# Altium PCB NB3000XN.PcbDoc (part 63 of 71)
Units mil, origin at the board's own origin, x right, y up, seen from the top; angles counter-clockwise.
Board outline 9527.56 x 6929.77 mil, 6 copper layers (Top Layer, GND+SHIELD, MidLayer1, MidLayer2, P2 - 3V3+5V0, Bottom Layer), stack 62.375 mil thick; 832 components, 1027 nets, 4655 pads, 4981 vias.
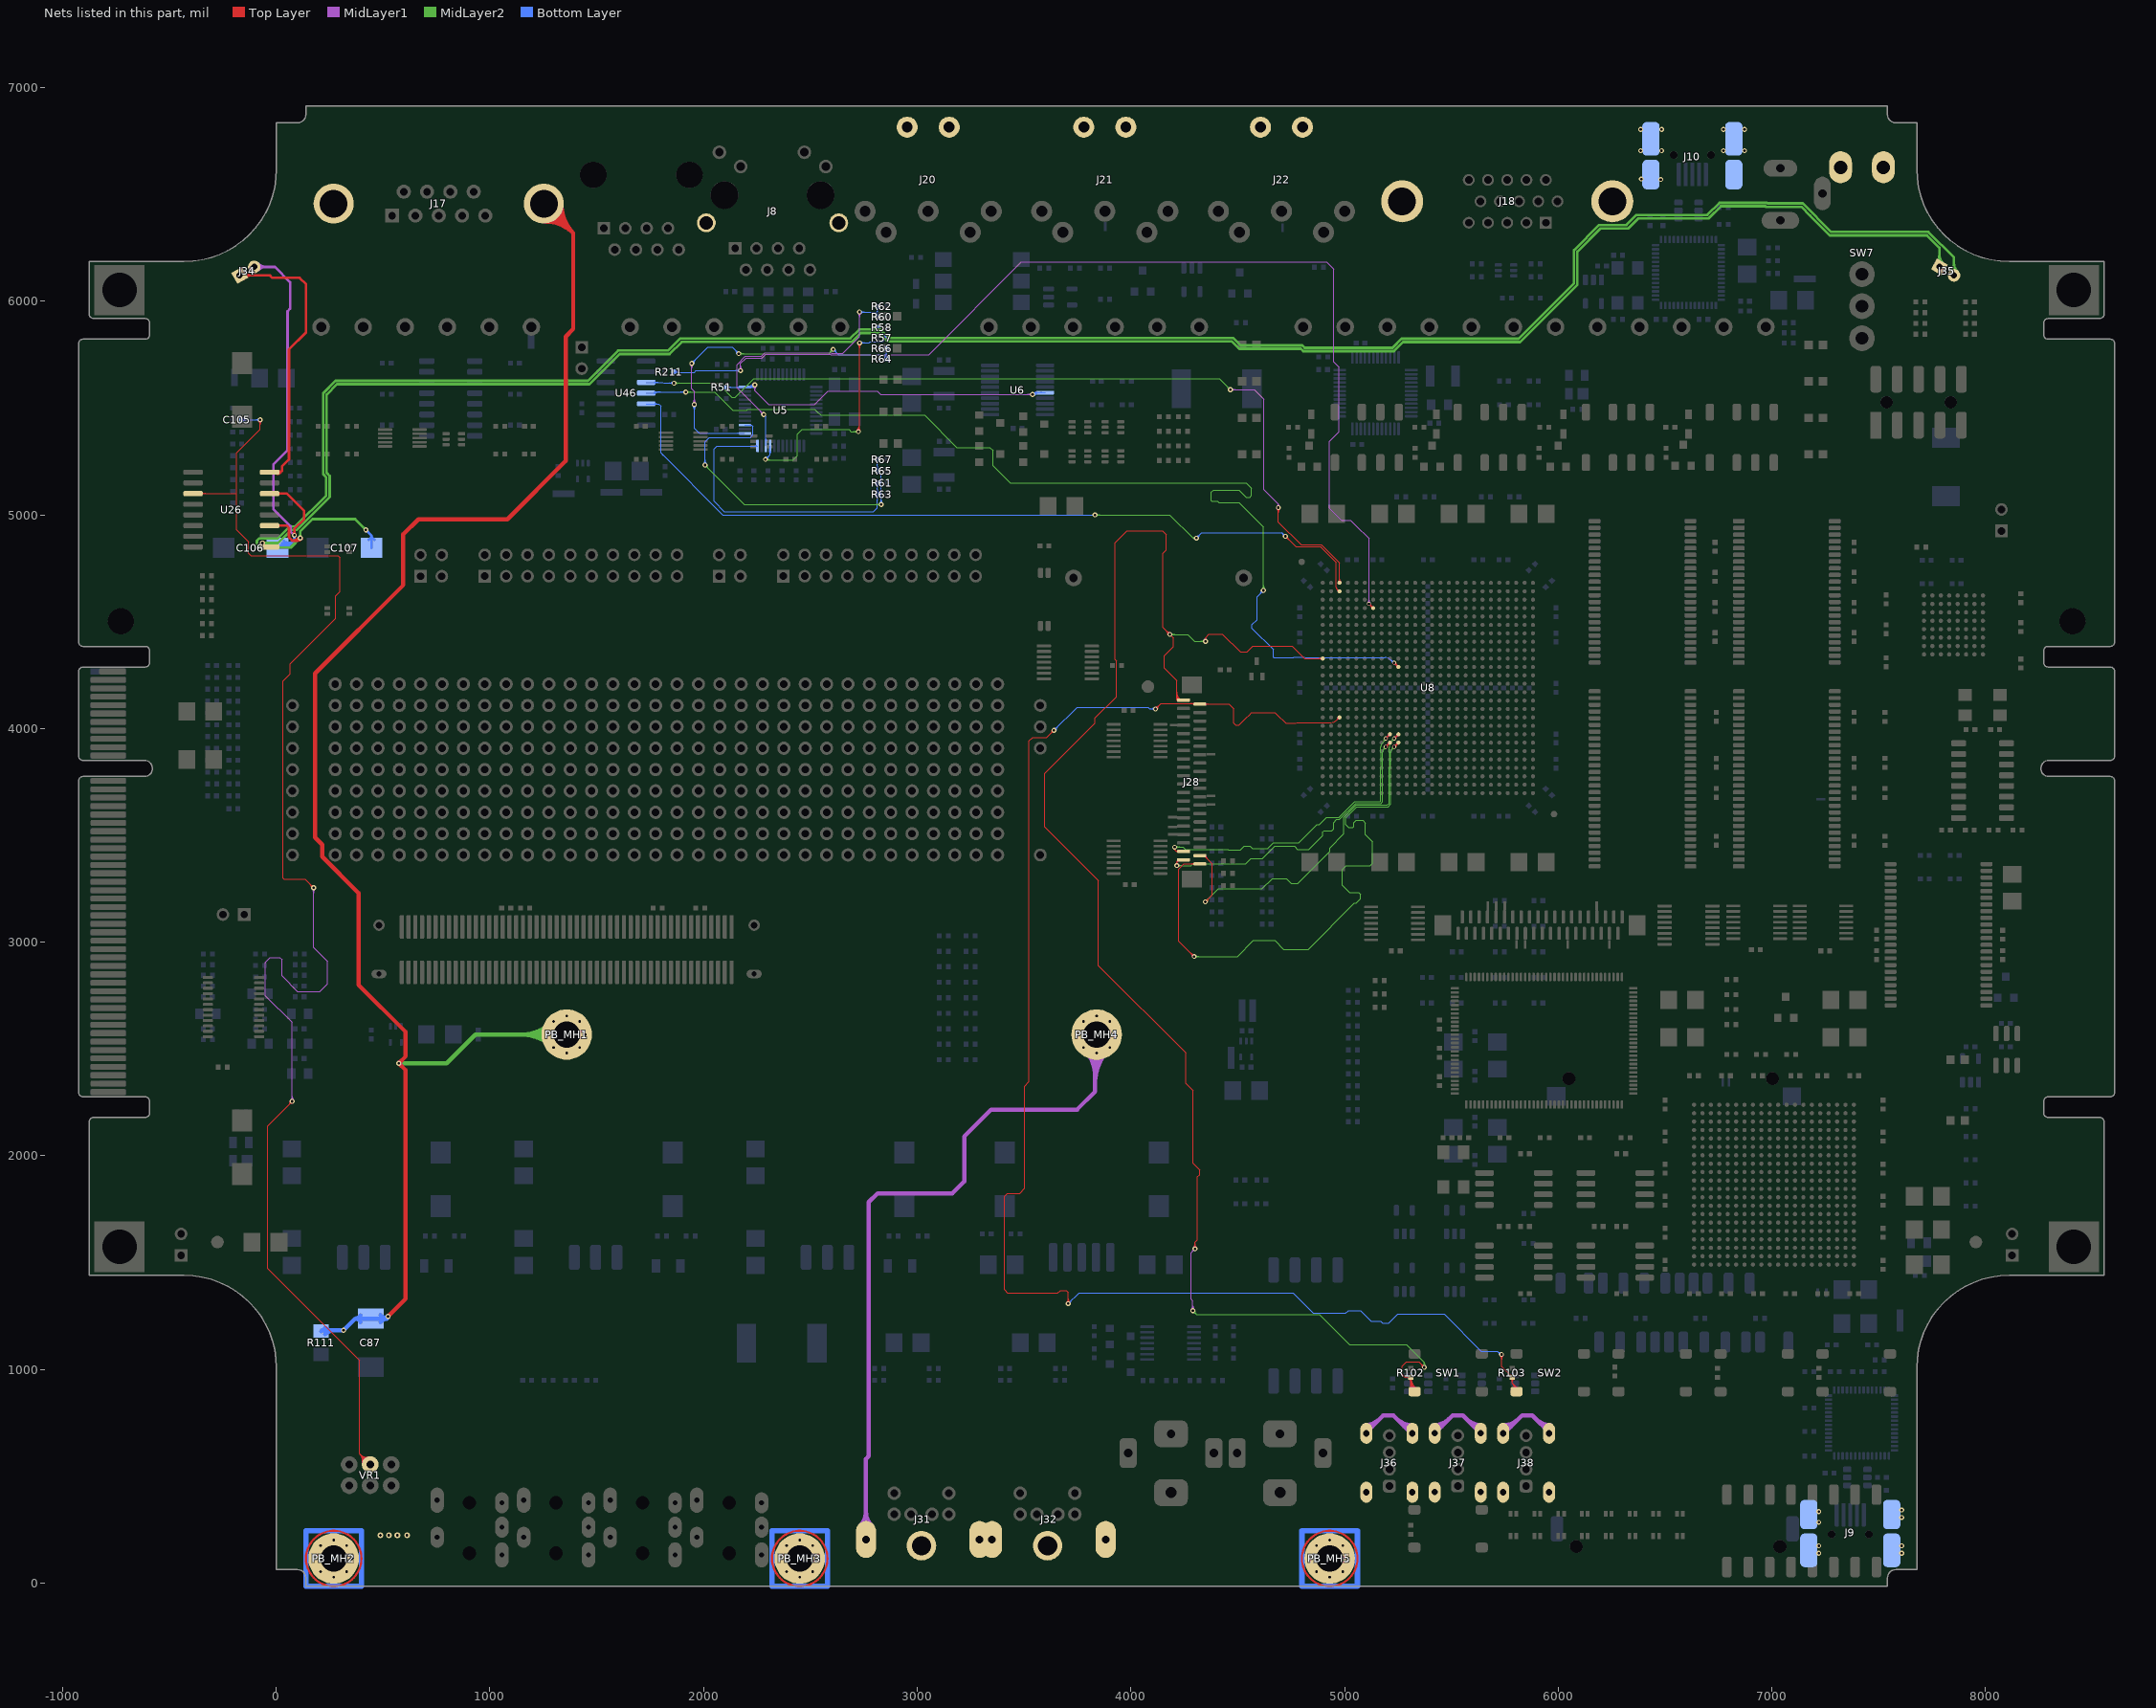
[diagram p67: the nets of this part, all layers, seen from the top]

## Via types
v1: diameter 23, hole 11.81, Top Layer to Bottom Layer, 3672 vias
v2: diameter 26, hole 11.81, Top Layer to Bottom Layer, 461 vias
v3: diameter 19, hole 11.81, Top Layer to Bottom Layer, tented both sides, 396 vias
v4: diameter 23.62, hole 11.81, Top Layer to Bottom Layer, 288 vias
v5: diameter 20, hole 11.81, Top Layer to Bottom Layer, 91 vias
v6: diameter 23, hole 11.81, Top Layer to Bottom Layer, tented both sides, 50 vias
v7: diameter 31, hole 11.81, Top Layer to Bottom Layer, 15 vias
v8: diameter 27.56, hole 11.81, Top Layer to Bottom Layer, tented both sides, 4 vias
v9: diameter 29, hole 11.81, Top Layer to Bottom Layer, 3 vias
v10: diameter 21, hole 11.81, Top Layer to Bottom Layer, 1 vias

## Nets (pads, with @x,y where several pads share a name; then routed paths per layer and width w, separated by ;. In a path a pad name is that pad's centre, name@x,y a point inside that pad or via, vN(x,y) a via of type N, cw(c..) or ccw(c..) an arc to the next point about the centre after c; other vN are vias at no path point) (continued)
RS485.RX_EN: U8.A3 U46.3 | length 4535.4
  Top Layer w4: v1@4683.47,5027.66 cw(c4667.26,5011.44) 4690.19,5011.44 cw(c4713.13,5011.44) v1@4696.91,5027.66 ; v1@4686.3,5030.49 cw(c4676.91,5021.1) 4690.19,5021.1 cw(c4703.47,5021.1) v1@4694.08,5030.49 ; v1(4690.19,5034.37) 4690.19,4966.71 4797.19,4859.71 4891.61,4859.71 4976.61,4774.7 4976.61,4724.74 4976.61,4720 4976.61,4710 U8.A3@4976.61,4682.13 ; U8.A3@4971.31,4687.43 ccw(c4958.51,4700.23) 4976.61,4700.23 ccw(c4994.72,4700.23) U8.A3@4981.92,4687.43 ; U8.A3@4971.42,4687.32 ccw(c4958.89,4699.85) 4976.61,4699.85 ccw(c4994.34,4699.85) U8.A3@4981.81,4687.32
  MidLayer1 w4: v1(4466.19,5586.04) 4578.96,5586.04 4623.52,5541.48 4623.52,5117.71 4690.19,5051.04 ; v1@4470.08,5582.15 cw(c4479.47,5572.76) 4479.47,5586.04 cw(c4479.47,5599.32) v1@4470.08,5589.93 ; v1@4472.91,5579.32 cw(c4489.13,5563.11) 4489.13,5586.04 cw(c4489.13,5608.98) v1@4472.91,5592.76 ; v1@4685.35,5042.55 ccw(c4680.32,5051.04) 4690.19,5051.04 ; v1(4690.19,5034.37) 4690.19,5051.04 ; v1@4695.03,5042.55 cw(c4700.06,5051.04) 4690.19,5051.04
  MidLayer2 w4: v1(1861.86,5616.71) 2065.19,5616.71 2131.86,5550.04 2148.52,5550.04 2231.86,5633.37 2236.29,5637.81 4414.42,5637.81 4418.86,5633.37 v1(4466.19,5586.04) ; v1@4456.69,5586.04 ccw(c4433.76,5586.04) 4449.97,5602.26 ccw(c4466.19,5618.48) v1@4466.19,5595.54 ; v1@4460.69,5586.04 ccw(c4447.41,5586.04) 4456.8,5595.43 ccw(c4466.19,5604.82) v1@4466.19,5591.54 ; 1875.14,5616.71 cw(c1875.14,5629.99) 1865.75,5620.6 ccw(c1875.14,5629.99) 1875.14,5616.71 ; 1875.14,5616.71 ccw(c1875.14,5603.43) 1865.75,5612.82 cw(c1875.14,5603.43) 1875.14,5616.71 ; 1884.79,5616.71 cw(c1884.79,5639.64) 1868.57,5623.43 ccw(c1884.79,5639.64) 1884.79,5616.71 ; 1884.79,5616.71 ccw(c1884.79,5593.77) 1868.57,5609.99 cw(c1884.79,5593.77) 1884.79,5616.71
  Bottom Layer w4: U46.3@1731.54,5620.08 1810,5620.08 1813.37,5616.71 v1(1861.86,5616.71) ; U46.3@1767.15,5615.97 cw(c1777.07,5606.05) 1777.07,5620.08 cw(c1777.07,5634.11) U46.3@1767.15,5624.19 ; U46.3@1769.98,5613.14 cw(c1786.72,5596.39) 1786.72,5620.08 cw(c1786.73,5643.76) U46.3@1769.98,5627.01 ; v1@1855.14,5609.99 ccw(c1838.92,5593.77) 1838.92,5616.71 ccw(c1838.92,5639.64) v1@1855.14,5623.43 ; v1@1857.97,5612.82 ccw(c1848.58,5603.43) 1848.58,5616.71 ccw(c1848.58,5629.99) v1@1857.97,5620.6
RS485.RXD: R211.1 U8.D7 | length 5431
  Top Layer w4: v3(5114.41,4583.7) U8.D7@5134.09,4564.02 ; U8.D7@5126.59,4564.02 ccw(c5108.49,4564.02) 5121.29,4576.82 ccw(c5134.09,4589.62) U8.D7@5134.09,4571.52 ; U8.D7@5126.75,4564.02 ccw(c5109.03,4564.02) 5121.56,4576.55 ccw(c5134.09,4589.08) U8.D7@5134.09,4571.36 ; 5127.21,4570.9 ccw(c5114.41,4558.09) 5114.41,4576.2 cw(c5114.41,4558.09) 5127.21,4570.9 ; 5127.21,4570.9 cw(c5140.02,4583.7) 5121.91,4583.7 ccw(c5140.02,4583.7) 5127.21,4570.9
  MidLayer1 w4: v1@2166.81,5681.76 ccw(c2150.59,5697.98) 2173.52,5697.98 ccw(c2196.46,5697.98) v1@2180.24,5681.76 ; v1@2169.64,5678.93 ccw(c2160.25,5688.32) 2173.52,5688.32 ccw(c2186.8,5688.32) v1@2177.41,5678.93 ; v1(2173.52,5675.04) 2173.52,5708.52 2199.21,5734.21 2274.21,5734.21 2291,5751 2594.84,5751 2596.29,5749.54 3054.54,5749.54 3488.37,6183.37 4916.63,6183.37 4950,6150 4950,5715.23 4973.52,5691.71 4973.52,5389.04 4929.52,5345.04 4929.52,5030.94 4985.43,4975.04 5028.45,4975.04 5051.23,4952.26 ; 5050,4953.49 5114.41,4889.08 5114.41,4720 5114.41,4710 5114.41,4661.38 v3(5114.41,4583.7) ; v3@5109.22,4588.89 ccw(c5096.68,4601.43) 5114.41,4601.43 ccw(c5132.14,4601.43) v3@5119.6,4588.89 ; 5114.41,4601.81 ccw(c5132.52,4601.81) 5119.71,4589 cw(c5132.52,4601.81) 5114.41,4601.81 ; 5114.41,4601.81 cw(c5096.3,4601.81) 5109.11,4589 ccw(c5096.3,4601.81) 5114.41,4601.81
  Bottom Layer w4: R211.1@1861.18,5670 1861.18,5666.71 1956.86,5666.71 1965.19,5675.04 v1(2173.52,5675.04) ; R211.1@1864.94,5673.27 ccw(c1880.78,5689.11) 1880.78,5666.71 ; R211.1@1867.77,5662.92 cw(c1876.92,5653.77) 1876.92,5666.71 ; R211.1@1867.77,5676.1 ccw(c1890.44,5698.77) 1890.44,5666.71 ; v1@2166.81,5668.32 ccw(c2150.59,5652.11) 2150.59,5675.04 ccw(c2150.59,5697.98) v1@2166.81,5681.76 ; v1@2169.64,5671.15 ccw(c2160.25,5661.76) 2160.25,5675.04 ccw(c2160.25,5688.32) v1@2169.64,5678.93
RS485.TX_EN: U8.L10 U46.4 | length 5352.4
  Top Layer w4: v3(5232.52,4308.11) U8.L10@5252.2,4288.43 ; U8.L10@5244.7,4288.43 ccw(c5226.6,4288.43) 5239.4,4301.23 ccw(c5252.2,4314.03) U8.L10@5252.2,4295.93 ; U8.L10@5244.86,4288.43 ccw(c5227.14,4288.43) 5239.67,4300.96 ccw(c5252.2,4313.49) U8.L10@5252.2,4295.77 ; 5245.32,4295.31 cw(c5258.13,4308.11) 5240.02,4308.11 ccw(c5258.13,4308.11) 5245.32,4295.31 ; 5245.32,4295.31 ccw(c5232.52,4282.5) 5232.52,4300.61 cw(c5232.52,4282.5) 5245.32,4295.31
  MidLayer2 w4: v1(1916.86,5575.04) 2051.86,5575.04 2127.99,5498.91 2137.02,5489.88 2201.5,5489.88 2207.17,5495.54 2519.69,5495.54 2533.5,5481.74 2548.52,5466.71 3034.84,5466.71 3185.41,5316.14 3340.18,5316.14 3355,5301.31 3355,5230 3434.96,5150.04 4540.19,5150.04 4565.19,5125.04 4565.19,5091.71 4556.86,5083.37 4540.19,5083.37 4506.86,5116.71 4386.71,5116.71 4377.28,5107.28 4377.28,5067.72 4379.5,5065.5 4405.56,5065.5 4412.69,5058.37 4506.86,5058.37 4590.12,4975.12 ; v1@1920.75,5571.15 cw(c1930.14,5561.76) 1930.14,5575.04 cw(c1930.14,5588.32) v1@1920.75,5578.93 ; v1@1923.57,5568.32 cw(c1939.79,5552.11) 1939.79,5575.04 cw(c1939.79,5597.98) v1@1923.57,5581.76 ; 4590,4975 4620.52,4944.48 v1(4620.52,4647.04) ; v1@4613.81,4653.76 ccw(c4597.59,4669.98) 4620.52,4669.98 ccw(c4643.46,4669.98) v1@4627.24,4653.76 ; v1@4616.64,4650.93 ccw(c4607.25,4660.32) 4620.52,4660.32 ccw(c4633.8,4660.32) v1@4624.41,4650.93
  Bottom Layer w4: U46.4@1731.54,5570.08 1763.04,5570.08 1765.19,5570.08 1765.19,5570.37 1769.86,5575.04 v1(1916.86,5575.04) ; U46.4@1764.32,5568.8 cw(c1779.39,5553.72) 1779.39,5575.04 ; U46.4@1767.15,5565.97 cw(c1789.05,5544.07) 1789.05,5575.04 ; U46.4@1769.98,5563.14 cw(c1798.71,5534.41) 1798.71,5575.04 ; U46.4@1769.98,5577.01 ccw(c1774.74,5581.78) U46.4@1774.74,5575.04 ; v1@1910.14,5568.32 ccw(c1893.92,5552.11) 1893.92,5575.04 ccw(c1893.92,5597.98) v1@1910.14,5581.76 ; v1@1912.97,5571.15 ccw(c1903.58,5561.76) 1903.58,5575.04 ccw(c1903.58,5588.32) v1@1912.97,5578.93 ; v1@4611.02,4647.04 cw(c4588.09,4647.04) 4604.31,4630.82 cw(c4620.52,4614.61) v1@4620.52,4637.54 ; v1@4615.02,4647.04 cw(c4601.75,4647.04) 4611.13,4637.65 cw(c4620.52,4628.26) v1@4620.52,4641.54 ; v1(4620.52,4647.04) 4590.19,4616.71 4590.19,4508.63 4567.5,4485.94 4567.5,4469.69 4667.19,4370 4667.19,4333.37 4668.52,4332.04 4761.88,4332.04 4764.84,4335 4813.75,4335 4816.78,4331.97 4860,4331.97 4870,4331.97 5076.1,4331.97 5095.52,4331.97 5169.64,4331.97 5189.14,4331.97 cw(c5189.14,4290.24) 5218.65,4319.75 ; v3@5225.05,4307.46 ccw(c5207.01,4305.88) 5218.65,4319.75 ; v3@5231.87,4315.58 cw(c5230.29,4333.62) 5218.65,4319.75
RS485.TXD: U8.B3 U46.5 | length 4162.6
  Top Layer w4: v1@4723.52,4890.54 cw(c4723.52,4867.61) 4739.74,4883.82 cw(c4755.96,4900.04) v1@4733.02,4900.04 ; v1@4723.52,4894.54 cw(c4723.52,4881.26) 4732.91,4890.65 cw(c4742.3,4900.04) v1@4729.02,4900.04 ; v1(4723.52,4900.04) 4771.86,4851.71 4888.17,4851.71 4889.67,4850.21 4889.79,4850.21 4961.11,4778.89 4961.11,4720 ; 4961.11,4724.74 4961.11,4720 ; 4961.11,4662.47 ccw(c4971.26,4662.47) 4964.08,4655.29 ; 4961.11,4662.47 ccw(c4971.26,4662.47) 4964.08,4655.29 ; 4961.11,4662.47 4961.11,4710 4961.11,4720 ; 4964.08,4655.29 ccw(c4976.61,4667.83) 4976.61,4650.1 cw(c4976.61,4667.83) 4964.08,4655.29 ; 4964.08,4655.29 cw(c4951.55,4642.76) 4969.27,4642.76 ccw(c4951.55,4642.76) 4964.08,4655.29
  MidLayer2 w4: v1(3831.86,5000.04) 4181.86,5000.04 4290.19,4891.71 ; v1@3835.75,4996.15 cw(c3845.14,4986.76) 3845.14,5000.04 cw(c3845.14,5013.32) v1@3835.75,5003.93 ; v1@3838.57,4993.32 cw(c3854.79,4977.11) 3854.79,5000.04 cw(c3854.79,5022.98) v1@3838.57,5006.76 ; v1@4298.68,4886.87 ccw(c4290.19,4881.84) 4290.19,4891.71 ; v1@4298.68,4896.55 cw(c4290.19,4901.58) 4290.19,4891.71 ; v1(4306.86,4891.71) 4290.19,4891.71
  Bottom Layer w4: U46.5@1731.54,5520.08 1780,5520.08 ; U46.5@1771.54,5515.19 cw(c1780,5510.32) 1780,5520.08 ; U46.5@1771.54,5524.97 ccw(c1780,5529.83) 1780,5520.08 ; 1810.61,5279.62 1800,5290.23 ; v1(3831.86,5000.04) 2090.19,5000.04 1800,5290.23 ; v1(4306.86,4891.71) 4332.19,4917.04 4706.52,4917.04 v1(4723.52,4900.04) ; v1@4306.86,4897.21 ccw(c4306.86,4910.49) 4316.25,4901.1 ccw(c4325.64,4891.71) v1@4312.36,4891.71 ; v1@4306.86,4901.21 ccw(c4306.86,4924.14) 4323.07,4907.93 ccw(c4339.29,4891.71) v1@4316.36,4891.71 ; v1@4714.02,4900.04 ccw(c4691.09,4900.04) 4707.31,4916.26 ccw(c4723.52,4932.48) v1@4723.52,4909.54 ; v1@4718.02,4900.04 ccw(c4704.75,4900.04) 4714.14,4909.43 ccw(c4723.52,4918.82) v1@4723.52,4905.54 ; 1780,5520.08 1789.92,5520.08 1800,5510 1800,5290.23
RXER_U: R51.1 U5.24 U6.6 | length 2078.5
  MidLayer1 w4: v1@2233.47,5601.66 cw(c2217.26,5585.44) 2240.19,5585.44 cw(c2263.13,5585.44) v1@2246.91,5601.66 ; v1@2236.3,5604.49 cw(c2226.91,5595.1) 2240.19,5595.1 cw(c2253.47,5595.1) v1@2244.08,5604.49 ; v1(2240.19,5608.37) 2240.19,5581.37 2304.86,5516.71 2456.86,5516.71 2520.39,5516.71 2582.69,5579 2813.82,5579 2828.78,5564.04 v1(3540.19,5564.04) ; v1@3533.47,5557.32 ccw(c3517.26,5541.11) 3517.26,5564.04 ccw(c3517.26,5586.98) v1@3533.47,5570.76 ; v1@3536.3,5560.15 ccw(c3526.91,5550.76) 3526.91,5564.04 ccw(c3526.91,5577.32) v1@3536.3,5567.93
  Bottom Layer w4: R51.1@2106.18,5598.33 U5.24@2193.48,5598.33 ; R51.1@2109.94,5594.57 cw(c2119.02,5585.49) 2119.02,5598.33 cw(c2119.02,5611.18) R51.1@2109.94,5602.09 ; R51.1@2112.77,5591.74 cw(c2128.68,5575.84) 2128.68,5598.33 cw(c2128.68,5620.83) R51.1@2112.77,5604.92 ; 2160.2,5598.33 cw(c2160.2,5588.45) U5.24@2167.19,5595.44 ; 2160.52,5598.33 ccw(c2160.52,5607.77) U5.24@2167.19,5601.1 ; U5.24@2203.06,5598.27 ccw(c2203.06,5644.73) v1@2236.26,5612.22 ; U5.24@2212.58,5598.27 ccw(c2212.58,5635.42) v1@2239.12,5609.42 ; U5.24@2219.9,5595.44 cw(c2226.73,5588.61) 2226.73,5598.27 cw(c2226.73,5607.92) U5.24@2219.9,5601.1 ; U5.24@2222.09,5598.27 ccw(c2222.09,5626.1) v1@2241.98,5606.63 ; 2231.61,5598.27 ccw(c2231.61,5616.78) v1@2244.83,5603.83 ; v1@2233.4,5615.02 cw(c2193.55,5654.05) U5.24@2193.54,5598.27 2238.42,5598.27 2240.19,5600.04 v1(2240.19,5608.37) ; v1@3538.42,5565.81 cw(c3553.86,5550.37) 3553.86,5572.2 ; v1(3540.19,5564.04) 3548.35,5572.2 U6.6@3598.94,5572.2 ; v1@3541.25,5562.98 cw(c3563.52,5540.71) U6.6@3563.52,5572.2 ; v1@3544.08,5560.15 cw(c3573.18,5531.05) U6.6@3573.18,5572.2 ; v1@3546.91,5557.32 cw(c3582.83,5521.4) U6.6@3582.83,5572.2 ; U6.6@3560.62,5567.36 ccw(c3548.92,5555.65) 3548.92,5572.2 ccw(c3548.92,5588.76) U6.6@3560.62,5577.05
S_LED0: R57.1 R58.1 U5.9 | length 1810.4
  Top Layer w4: v4@2718.06,5396.94 ccw(c2689.24,5425.76) 2730,5425.76 ; v4@2720.89,5394.11 ccw(c2698.9,5416.1) 2730,5416.1 ; v4@2723.06,5798.06 cw(c2706.31,5781.31) 2730,5781.31 cw(c2753.69,5781.31) v4@2736.94,5798.06 ; v4@2723.72,5391.28 ccw(c2708.56,5406.44) 2730,5406.44 ; v4(2725,5390) 2730,5395 v4(2730,5805) ; v4@2725.89,5800.89 cw(c2715.97,5790.97) 2730,5790.97 cw(c2744.03,5790.97) v4@2734.11,5800.89 ; 2730,5401.61 ccw(c2736.61,5401.61) v4@2731.94,5396.94
  MidLayer2 w4: v4(2290,5260) 2292.46,5257.54 2420,5257.54 2439.7,5277.24 2439.7,5377.53 2462.7,5400.54 2680,5400.54 2690.54,5390 v4(2725,5390) ; v4@2294.11,5264.11 ccw(c2309.97,5279.97) 2309.97,5257.54 ; v4@2296.94,5253.06 cw(c2307.75,5242.25) 2307.75,5257.54 ; v4@2296.94,5266.94 ccw(c2319.62,5289.62) 2319.62,5257.54 ; v4@2718.06,5383.06 ccw(c2701.31,5366.31) 2701.31,5390 ccw(c2701.31,5413.69) v4@2718.06,5396.94 ; v4@2720.89,5385.89 ccw(c2710.97,5375.97) 2710.97,5390 ccw(c2710.97,5404.03) v4@2720.89,5394.11
  Bottom Layer w4: v4(2290,5260) 2311.65,5281.65 U5.9@2311.65,5322.68 ; v4@2290,5265.81 ccw(c2290,5279.84) 2299.92,5269.92 ccw(c2309.84,5260) v4@2295.81,5260 ; v4@2290,5269.81 ccw(c2290,5293.5) 2306.75,5276.75 ccw(c2323.5,5260) v4@2299.81,5260 ; U5.9@2308.82,5296.32 cw(c2302,5289.49) 2311.65,5289.49 cw(c2321.31,5289.49) U5.9@2314.48,5296.32 ; v4(2730,5805) 2774.96,5805 2780,5810.04 2838.22,5810.04 R57.1@2856.18,5828 ; v4@2734.11,5800.89 cw(c2744.03,5790.97) 2744.03,5805 cw(c2744.03,5819.03) v4@2734.11,5809.11 ; v4@2736.94,5798.06 cw(c2753.69,5781.31) 2753.69,5805 cw(c2753.69,5828.69) v4@2736.94,5811.94 ; R58.1@2813.82,5867.19 cw(c2813.82,5843.5) 2830.57,5860.25 ; R58.1@2813.82,5871.19 cw(c2813.82,5857.16) R58.1@2823.74,5867.08 ; R58.1@2813.82,5877 R57.1@2856.18,5834.64 ; R58.1@2819.14,5876.51 ccw(c2830.79,5876.51) R58.1@2822.55,5868.27 ; R58.1@2823.14,5876.51 ccw(c2844.45,5876.51) 2829.38,5861.44 ; 2835.93,5854.89 cw(c2809.53,5828.49) R57.1@2846.86,5828.49 ; 2839.43,5811.25 cw(c2856.18,5794.5) R57.1@2856.18,5818.19 ; 2840.62,5812.44 ccw(c2825.55,5827.51) R57.1@2846.86,5827.51 ; 2842.76,5848.06 cw(c2823.18,5828.49) R57.1@2850.86,5828.49 ; R57.1@2846.26,5818.08 cw(c2856.18,5808.16) R57.1@2856.18,5822.19 ; R57.1@2847.45,5819.27 ccw(c2839.21,5827.51) R57.1@2850.86,5827.51 ; 2849.58,5841.23 cw(c2836.84,5828.49) R57.1@2854.86,5828.49 ; 2850.76,5840.05 ccw(c2856.18,5845.47) R57.1@2856.18,5837.81
S_LED1: R60.2 R62.1 U5.10 | length 1575.8
  MidLayer1 w4: v1@2272.36,5470.04 ccw(c2249.42,5470.04) 2265.64,5486.26 ccw(c2281.86,5502.48) v1@2281.86,5479.54 ; v1@2276.36,5470.04 ccw(c2263.08,5470.04) 2272.47,5479.43 ccw(c2281.86,5488.82) v1@2281.86,5475.54 ; v1(2281.86,5470.04) 2156.02,5595.87 2156.02,5702.34 2195.89,5742.21 2267.21,5742.21 2270.89,5742.21 2287.69,5759 2598.15,5759 2599.61,5757.54 2652.54,5757.54 2730,5835 v1(2730,5950) ; v1@2723.28,5943.28 cw(c2707.06,5927.06) 2730,5927.06 cw(c2752.93,5927.06) v1@2736.72,5943.28 ; v1@2726.11,5946.11 cw(c2716.72,5936.72) 2730,5936.72 cw(c2743.28,5936.72) v1@2733.89,5946.11
  Bottom Layer w4: v1(2281.86,5470.04) 2291.97,5459.93 U5.10@2291.97,5322.68 ; U5.10@2289.14,5349.03 ccw(c2282.31,5355.86) 2291.97,5355.86 ccw(c2301.63,5355.86) U5.10@2294.8,5349.03 ; v1(2730,5950) 2805.49,5950.04 ; v1@2733.89,5946.11 cw(c2743.29,5936.73) 2743.28,5950.01 cw(c2743.27,5963.29) v1@2733.89,5953.89 ; v1@2736.72,5943.29 cw(c2752.95,5927.08) 2752.94,5950.01 cw(c2752.92,5972.95) v1@2736.71,5956.72 ; R62.1@2807.23,5967.92 cw(c2791.32,5952.01) 2813.82,5952.01 cw(c2836.32,5952.01) R62.1@2820.41,5967.92 ; R60.2@2809.58,5934.79 ccw(c2806.06,5941.71) 2813.82,5941.71 ; R62.1@2810.06,5970.75 cw(c2800.98,5961.67) 2813.82,5961.67 cw(c2826.66,5961.67) R62.1@2817.58,5970.75 ; 2813.78,5950.04 2805.49,5950.04 ; R60.2@2813.82,5926 2813.82,5941.71 ; 2813.82,5950 R62.1@2813.82,5975 ; R60.2@2818.05,5934.79 cw(c2821.58,5941.71) 2813.82,5941.71 ; 2805.49,5950.04 2813.82,5941.71
S_LED2: R61.1 R63.1 U5.12 | length 1544.7
  Bottom Layer w4: 2242.62,5322.81 cw(c2242.62,5312.7) U5.12@2249.77,5319.85 ; 2243.26,5322.81 ccw(c2243.26,5332.01) U5.12@2249.77,5325.51 ; U5.12@2252.6,5322.68 2252.46,5322.81 2062.96,5322.81 2048.52,5308.37 2048.52,5064.34 2096.82,5016.04 2796.04,5016.04 2813.82,5033.82 R61.1@2813.82,5150 ; R63.1@2807.23,5087.92 cw(c2791.32,5072.01) 2813.82,5072.01 cw(c2836.32,5072.01) R63.1@2820.41,5087.92 ; R63.1@2807.23,5102.08 ccw(c2791.32,5117.99) 2813.82,5117.99 ccw(c2836.32,5117.99) R63.1@2820.41,5102.08 ; R61.1@2807.23,5142.92 cw(c2791.32,5127.01) 2813.82,5127.01 cw(c2836.32,5127.01) R61.1@2820.41,5142.92 ; R63.1@2810.06,5090.75 cw(c2800.98,5081.67) 2813.82,5081.67 cw(c2826.66,5081.67) R63.1@2817.58,5090.75 ; R63.1@2810.06,5099.25 ccw(c2800.98,5108.33) 2813.82,5108.33 ccw(c2826.66,5108.33) R63.1@2817.58,5099.25 ; R61.1@2810.06,5145.75 cw(c2800.98,5136.67) 2813.82,5136.67 cw(c2826.66,5136.67) R61.1@2817.58,5145.75
S_LED3: R64.2 R66.1 U5.13 | length 2165.1
  MidLayer1 w4: v4@1938.06,5703.06 cw(c1921.31,5686.31) 1945,5686.31 cw(c1968.69,5686.31) v4@1951.94,5703.06 ; v4@1940.89,5705.89 cw(c1930.97,5695.97) 1945,5695.97 cw(c1959.03,5695.97) v4@1949.11,5705.89 ; v4(1945,5710) 1945,5590 1956.86,5578.14 v1(1956.86,5516.71) ; v1@1950.14,5523.43 ccw(c1933.92,5539.64) 1956.86,5539.64 ccw(c1979.79,5539.64) v1@1963.57,5523.43 ; v1@1952.97,5520.6 ccw(c1943.58,5529.99) 1956.86,5529.99 ccw(c1970.14,5529.99) v1@1960.75,5520.6
  MidLayer2 w4: v4(2165,5755) 2586.82,5755 v1(2606.86,5775.04) ; v4@2169.11,5750.89 cw(c2179.03,5740.97) 2179.03,5755 cw(c2179.03,5769.03) v4@2169.11,5759.11 ; v4@2171.94,5748.06 cw(c2188.69,5731.31) 2188.69,5755 cw(c2188.69,5778.69) v4@2171.94,5761.94 ; v1@2597.36,5775.04 cw(c2574.42,5775.04) 2590.64,5758.82 cw(c2606.86,5742.61) v1@2606.86,5765.54 ; v1@2601.36,5775.04 cw(c2588.08,5775.04) 2597.47,5765.65 cw(c2606.86,5756.26) v1@2606.86,5769.54
  Bottom Layer w4: v4(1945,5710) 2020,5785 2135,5785 v4(2165,5755) ; v4@1945,5715.81 ccw(c1945,5729.84) 1954.92,5719.92 ccw(c1964.84,5710) v4@1950.81,5710 ; v4@1945,5719.81 ccw(c1945,5743.5) 1961.75,5726.75 ccw(c1978.5,5710) v4@1954.81,5710 ; v1@1950.14,5509.99 cw(c1933.92,5493.77) 1956.86,5493.77 cw(c1979.79,5493.77) v1@1963.57,5509.99 ; v1@1952.97,5512.82 cw(c1943.58,5503.43) 1956.86,5503.43 cw(c1970.14,5503.43) v1@1960.75,5512.82 ; v1(1956.86,5516.71) 1956.86,5405 1980.13,5381.73 U5.13@2193.54,5381.73 ; v4@2155.19,5755 ccw(c2131.5,5755) 2148.25,5771.75 ccw(c2165,5788.5) v4@2165,5764.81 ; v4@2159.19,5755 ccw(c2145.16,5755) 2155.08,5764.92 ccw(c2165,5774.84) v4@2165,5760.81 ; U5.13@2167.19,5378.9 ccw(c2160.36,5372.08) 2160.36,5381.73 ccw(c2160.36,5391.39) U5.13@2167.19,5384.56 ; v1@2606.86,5765.54 cw(c2606.86,5742.61) 2623.07,5758.82 cw(c2639.29,5775.04) v1@2616.36,5775.04 ; v1@2606.86,5769.54 cw(c2606.86,5756.26) 2616.25,5765.65 cw(c2625.64,5775.04) v1@2612.36,5775.04 ; v1(2606.86,5775.04) 2631.86,5750.04 2854.51,5750.04 2856.18,5751.71 ; R66.1@2849.59,5771.92 cw(c2833.68,5756.01) 2856.18,5756.01 cw(c2878.68,5756.01) R66.1@2862.77,5771.92 ; R64.2@2849.88,5737.35 ccw(c2836.69,5751.71) 2856.18,5751.71 ; R66.1@2852.42,5774.75 cw(c2843.34,5765.67) 2856.18,5765.67 cw(c2869.02,5765.67) R66.1@2859.94,5774.75 ; R64.2@2852.58,5734.41 ccw(c2845.06,5742.6) 2856.18,5742.6 ccw(c2867.3,5742.6) R64.2@2859.78,5734.41 ; R64.2@2856.18,5730 2856.18,5751.71 ; R66.1@2856.18,5779 2856.18,5751.71 ; R64.2@2862.49,5737.35 cw(c2875.67,5751.71) 2856.18,5751.71
S_LED4: R65.1 R67.1 U5.15 | length 1954.1
  MidLayer2 w4: v1@2006.86,5223.87 cw(c2006.86,5200.94) 2023.07,5217.16 cw(c2039.29,5233.37) v1@2016.36,5233.37 ; v1@2006.86,5227.87 cw(c2006.86,5214.6) 2016.25,5223.99 cw(c2025.64,5233.37) v1@2012.36,5233.37 ; v1(2006.86,5233.37) 2191.52,5048.71 v1(2831.86,5048.71) ; v1@2825.14,5041.99 ccw(c2808.92,5025.77) 2808.92,5048.71 ccw(c2808.92,5071.64) v1@2825.14,5055.43 ; v1@2827.97,5044.82 ccw(c2818.58,5035.43) 2818.58,5048.71 ccw(c2818.58,5061.99) v1@2827.97,5052.6
  Bottom Layer w4: v1@2000.14,5240.09 ccw(c1983.92,5256.31) 2006.86,5256.31 ccw(c2029.79,5256.31) v1@2013.57,5240.09 ; v1@2002.97,5237.26 ccw(c1993.58,5246.65) 2006.86,5246.65 ccw(c2020.14,5246.65) v1@2010.75,5237.26 ; v1(2006.86,5233.37) 2006.86,5342.05 2027.62,5362.81 2219.63,5362.81 2231.86,5375.04 2231.86,5413.1 2223.86,5421.1 U5.15@2193.54,5421.1 ; U5.15@2217.07,5421.1 cw(c2217.25,5405.15) 2228.53,5416.43 ; R65.1@2807.23,5212.08 ccw(c2791.32,5227.99) 2813.82,5227.99 ccw(c2836.32,5227.99) R65.1@2820.41,5212.08 ; R67.1@2807.23,5252.92 cw(c2791.32,5237.01) 2813.82,5237.01 cw(c2836.32,5237.01) R67.1@2820.41,5252.92 ; R65.1@2810.06,5209.25 ccw(c2800.98,5218.33) 2813.82,5218.33 ccw(c2826.66,5218.33) R65.1@2817.58,5209.25 ; R67.1@2810.06,5255.75 cw(c2800.98,5246.67) 2813.82,5246.67 cw(c2826.66,5246.67) R67.1@2817.58,5255.75 ; R65.1@2813.82,5195.19 cw(c2813.82,5171.5) 2830.57,5188.25 ; R65.1@2813.82,5199.19 cw(c2813.82,5185.16) R65.1@2823.74,5195.08 ; R67.1@2813.82,5260 R65.1@2813.82,5205 2831.86,5186.96 v1(2831.86,5048.71) ; R65.1@2819.14,5204.51 ccw(c2830.79,5204.51) R65.1@2822.55,5196.27 ; R65.1@2823.14,5204.51 ccw(c2844.45,5204.51) 2829.38,5189.44 ; v1@2825.14,5055.43 ccw(c2808.92,5071.64) 2831.86,5071.64 ccw(c2854.79,5071.64) v1@2838.57,5055.43 ; v1@2827.97,5052.6 ccw(c2818.58,5061.99) 2831.86,5061.99 ccw(c2845.14,5061.99) v1@2835.75,5052.6
SHIELD: C87.1 J8.MH1 J8.MH2 J9.6 J9.7 J9.8 J9.9 J10.6 J10.7 J10.8 J10.9 J17.10 J17.11 J18.16 J18.17 J20.MH1 J20.MH2 J21.MH1 J21.MH2 J22.MH1 J22.MH2 J31.MH1 J31.MH2 J31.MH3 J32.MH1 J32.MH2 J32.MH3 J36.MH1 J36.MH2 J36.MH3 J36.MH4 J37.MH1 J37.MH2 J37.MH3 J37.MH4 J38.MH1 J38.MH2 J38.MH3 J38.MH4 PB_MH1.STAND PB_MH2.STAND PB_MH3.STAND PB_MH4.STAND PB_MH5.STAND R111.1 SW7.S1 SW7.S2 | length 14956.3
  Top Layer w20: v1(523.52,1248.71) 606,1331.18 606,2400.9 v1(573.52,2433.37) 606,2465.85 606,2580.06 385,2801.06 385,3230 215,3400 215,3456.86 181.86,3490 181.86,4258.57 595,4671.72 595,4910 665,4980 1082.19,4980 1355.5,5253.31 1355.5,5389.5 1355,5390 1355,5835 1390,5870 1390,6319.61 J17.10@1252.51,6457.09 ; J17.10@1253.72,6413.41 cw(c1256.38,6317.4) 1324.29,6385.31 cw(c1392.21,6453.23) J17.10@1296.2,6455.89 ; J17.10@1254.27,6393.42 cw(c1258.14,6253.47) 1357.14,6352.46 cw(c1456.14,6451.46) J17.10@1316.19,6455.33 ; J17.10@1254.83,6373.43 cw(c1259.91,6189.53) 1389.99,6319.61 cw(c1520.07,6449.69) J17.10@1336.18,6454.78
  MidLayer1 w20: J31.MH3@2734.02,270.27 ccw(c2670.44,333.85) 2760.35,333.85 ccw(c2850.27,333.85) J31.MH3@2786.69,270.27 ; J31.MH3@2760.35,204.57 2760.35,581.83 2773.52,595 2773.52,1783.52 2815,1825 3165.15,1825 3220.07,1879.93 3220.07,2090.07 3346.71,2216.71 3748.52,2216.71 3831.86,2300.04 3831.86,2481.3 3831.86,2567.91 3831.86,2575.04 3839.98,2575.04 PB_MH4.STAND@3839.98,2567.91 ; PB_MH4.STAND@3777.46,2505.38 cw(c3646.12,2374.05) 3831.86,2374.05 ; PB_MH4.STAND@3791.6,2519.53 cw(c3694.41,2422.34) 3831.86,2422.34 ; 3831.86,2334.82 cw(c4073.08,2334.82) PB_MH4.STAND@3902.51,2505.38 ; 3831.86,2383.1 cw(c4024.79,2383.1) PB_MH4.STAND@3888.37,2519.53 ; 3831.86,2431.38 cw(c3976.51,2431.38) PB_MH4.STAND@3874.22,2533.67 ; 3831.86,2457.31 cw(c3863.97,2457.31) PB_MH4.STAND@3841.26,2480.02 ; PB_MH4.STAND@3831.86,2505.29 ccw(c3863.97,2505.29) PB_MH4.STAND@3841.26,2482.58 ; J36.MH4@5097.22,701.18 5181.04,785 5228.75,785 J36.MH3@5312.57,701.18 ; J36.MH4@5097.22,720.39 ccw(c5097.22,766.78) 5130.02,733.98 ; J36.MH4@5097.22,740.39 ccw(c5097.22,835.06) 5164.16,768.12 ; 5245.63,768.12 ccw(c5312.57,835.06) J36.MH3@5312.57,740.39 ; 5279.77,733.98 ccw(c5312.57,766.78) J36.MH3@5312.57,720.39 ; J37.MH4@5422.22,701.57 5506.04,785.39 5553.75,785.39 J37.MH3@5637.57,701.57 ; J37.MH4@5422.22,720.79 ccw(c5422.22,767.17) 5455.02,734.37 ; J37.MH4@5422.22,740.79 ccw(c5422.22,835.46) 5489.16,768.51 ; 5570.63,768.51 ccw(c5637.57,835.46) J37.MH3@5637.57,740.79 ; 5604.77,734.37 ccw(c5637.57,767.17) J37.MH3@5637.57,720.79 ; J38.MH4@5747.22,701.18 5831.04,785 5878.75,785 J38.MH3@5962.57,701.18 ; J38.MH4@5747.22,720.39 ccw(c5747.22,766.78) 5780.02,733.98 ; J38.MH4@5747.22,740.39 ccw(c5747.22,835.06) 5814.16,768.12 ; 5895.63,768.12 ccw(c5962.57,835.06) J38.MH3@5962.57,740.39 ; 5929.77,733.98 ccw(c5962.57,766.78) J38.MH3@5962.57,720.39
  MidLayer2 w20: v1(573.52,2433.37) 797.32,2433.37 931.86,2567.91 v4(1273.05,2567.91) PB_MH1.STAND@1359.67,2567.91 ; PB_MH1.STAND@1297.14,2505.38 ccw(c1146.19,2354.43) 1146.19,2567.91 ccw(c1146.19,2781.39) PB_MH1.STAND@1297.14,2630.44 ; PB_MH1.STAND@1311.28,2519.53 ccw(c1194.48,2402.72) 1194.48,2567.91 ccw(c1194.47,2733.1) PB_MH1.STAND@1311.28,2616.29 ; PB_MH1.STAND@1325.43,2533.67 ccw(c1242.76,2451) 1242.76,2567.91 ccw(c1242.76,2684.82) PB_MH1.STAND@1325.43,2602.15
  Bottom Layer w20: R111.1@210,1180.12 213.26,1183.37 v1(315.19,1183.37) 370,1238.19 ; R111.1@229.14,1164.92 cw(c273.7,1120.36) 273.7,1183.37 ; R111.1@229.14,1195.32 ccw(c257.97,1224.15) 257.97,1183.37 ; C87.1@394.75,1222.58 ccw(c370.01,1210.77) 370.01,1238.19 ; C87.1@394.75,1253.8 cw(c370.01,1265.61) 370.01,1238.19 ; C87.1@488.79,1220.75 cw(c518.26,1204.58) 518.26,1238.19 ; C87.1@488.79,1255.63 ccw(c518.26,1271.8) 518.26,1238.19 ; C87.1@494.51,1238.19 ccw(c494.51,1277.72) v1@522.46,1249.77 ; v1(523.52,1248.71) 523.52,1243.45 518.26,1238.19 ; J18.17@5269.76,6468 5273.52,6468 J18.17@5316.48,6425.04 ; J18.16@6210.66,6425.04 J18.16@6253.61,6468 ; 370,1238.19 439.24,1238.19 518.26,1238.19
  other v1: 7220,140 7607.8,140 7220,175 7607.8,175 7220,285 7607.8,307.32 7220,335 7607.8,342.32 6480,6570 6389.1,6571.98 6385.9,6704.66 6484.1,6704.66 6773.7,6704.66 6871.89,6704.66 6385.9,6804.66 6484.1,6804.66 6773.7,6804.66 6871.89,6804.66
  other v4: 269.12,28.54 2450.22,28.54 4930.54,28.54 207.87,53.91 330.36,53.91 2388.97,53.91 2511.47,53.91 4869.29,53.91 4991.78,53.91 182.5,115.16 355.73,115.16 2363.61,115.16 2536.83,115.16 4843.92,115.16 5017.15,115.16 207.87,176.4 330.36,176.4 2388.97,176.4 2511.47,176.4 4869.29,176.4 4991.78,176.4 269.12,201.77 2450.22,201.77 4930.54,201.77 1359.67,2481.3 3839.98,2481.3 1298.42,2506.67 1420.91,2506.67 3778.74,2506.67 3901.23,2506.67 1446.28,2567.91 3753.37,2567.91 3926.6,2567.91 1298.42,2629.16 1420.91,2629.16 3778.74,2629.16 3901.23,2629.16 1359.67,2654.53 3839.98,2654.53
  other v8: 487.34,224.08 527.34,224.08 567.34,224.08 612.34,224.08
SPAREIO.1: J28.37 U8.W9 | length 1714.4
  Top Layer w4: v1(4204.86,3444.71) 4204.86,3433.2 4212.86,3425.2 ; J28.37@4219.76,3421.71 ccw(c4212.86,3416.62) 4212.86,3425.2 ; J28.37@4219.76,3428.68 cw(c4212.86,3433.77) 4212.86,3425.2 ; J28.37@4246.61,3425.2 4212.86,3425.2 ; v3(5193.15,3953.78) U8.W9@5212.83,3973.46 ; U8.W9@5205.33,3973.46 cw(c5187.23,3973.46) 5200.03,3960.66 cw(c5212.83,3947.86) U8.W9@5212.83,3965.96 ; U8.W9@5205.49,3973.46 cw(c5187.77,3973.46) 5200.3,3960.93 cw(c5212.83,3948.4) U8.W9@5212.83,3966.12 ; 5205.95,3966.58 cw(c5193.15,3979.39) 5193.15,3961.28 ccw(c5193.15,3979.39) 5205.95,3966.58 ; 5205.95,3966.58 ccw(c5218.76,3953.78) 5200.65,3953.78 cw(c5218.76,3953.78) 5205.95,3966.58
  MidLayer2 w4: v1(4204.86,3444.71) 4243.67,3444.71 4255,3433.37 4454.86,3433.37 4456.86,3431.37 4513.19,3431.37 4531.86,3450.04 4556.86,3450.04 4568.19,3438.71 4639.56,3438.71 4667.23,3466.37 4786.86,3466.37 4870.52,3550.04 4881.86,3550.04 4915.19,3583.37 4973.52,3583.37 5048.19,3658.04 5167.33,3658.04 5169.29,3660 5169.29,3670 5169.29,3739.1 ; v1@4208.75,3440.82 cw(c4218.14,3431.43) 4218.14,3444.71 cw(c4218.14,3457.99) v1@4208.75,3448.6 ; v1@4211.57,3437.99 cw(c4227.79,3421.77) 4227.79,3444.71 cw(c4227.79,3467.64) v1@4211.57,3451.43 ; 5169.29,3680.84 5169.29,3739.1 ; v3@5185.76,3952.48 cw(c5167.93,3949.33) 5182.76,3938.95 ; v3@5194.45,3946.39 ccw(c5197.6,3928.56) 5182.76,3938.95 ; 5169.29,3739.1 5169.29,3797.36 5169.29,3816.78 5169.29,3890.9 5169.29,3914.15 cw(c5193.06,3914.15) 5175.68,3930.37 5182.76,3938.95
SPAREIO.2: J28.38 U8.W10 | length 2007.1
  Top Layer w4: J28.38@4323.39,3405.51 4323.52,3405.51 4323.52,3408.37 4340.19,3408.37 4381.86,3366.71 4381.86,3222.37 v1(4348.52,3189.04) ; J28.38@4345.51,3399.64 cw(c4345.51,3391.39) 4351.34,3397.22 ; J28.38@4347.39,3405.51 ccw(c4357.85,3405.51) J28.38@4350.45,3398.12 ; v1@4348.52,3194.54 ccw(c4348.52,3207.82) 4357.91,3198.43 ccw(c4367.3,3189.04) v1@4354.02,3189.04 ; v1@4348.52,3198.54 ccw(c4348.52,3221.48) 4364.74,3205.26 ccw(c4380.96,3189.04) v1@4358.02,3189.04 ; J28.38@4351.39,3405.51 ccw(c4371.5,3405.51) 4357.28,3391.29 ; v3(5232.52,3953.78) U8.W10@5252.2,3973.46 ; U8.W10@5244.7,3973.46 cw(c5226.6,3973.46) 5239.4,3960.66 cw(c5252.2,3947.86) U8.W10@5252.2,3965.96 ; U8.W10@5244.86,3973.46 cw(c5227.14,3973.46) 5239.67,3960.93 cw(c5252.2,3948.4) U8.W10@5252.2,3966.12 ; 5245.32,3966.58 ccw(c5258.13,3953.78) 5240.02,3953.78 cw(c5258.13,3953.78) 5245.32,3966.58 ; 5245.32,3966.58 cw(c5232.52,3979.39) 5232.52,3961.28 ccw(c5232.52,3979.39) 5245.32,3966.58
  MidLayer2 w4: v1(4348.52,3189.04) 4409.52,3250.04 4613.54,3250.04 4661.88,3298.37 4726.84,3298.37 4730.21,3295 4750.5,3274.71 4781.52,3274.71 4789.19,3282.37 4931.86,3425.04 4931.86,3441.71 4997.19,3507.04 4997.19,3584.37 5054.86,3642.04 5201.04,3642.04 5208.66,3649.66 5208.66,3660 5208.66,3670 5208.66,3685 ; v1@4348.52,3194.54 ccw(c4348.52,3207.82) 4357.91,3198.43 ccw(c4367.3,3189.04) v1@4354.02,3189.04 ; v1@4348.52,3198.54 ccw(c4348.52,3221.48) 4364.74,3205.26 ccw(c4380.96,3189.04) v1@4358.02,3189.04 ; 5208.66,3680.84 5208.66,3685 ; v3@5225.05,3953.13 cw(c5207.01,3951.55) 5220.88,3939.91 ; v3@5233.17,3946.31 ccw(c5234.75,3928.27) 5220.88,3939.91 ; 5208.66,3685 5208.66,3797.36 5208.66,3816.78 5208.66,3890.9 5208.66,3910.4 cw(c5250.39,3910.4) 5220.88,3939.91
SPAREIO.3: J28.39 U8.Y9 | length 1787.2
  Top Layer w4: v1@4210.35,3366.55 ccw(c4205.32,3375.04) 4215.19,3375.04 ; v1(4215.19,3358.37) 4215.19,3375.04 ; 4215.93,3375.78 ccw(c4208.81,3382.91) J28.39@4218.71,3384.75 ; 4217,3376.85 cw(c4224.49,3369.36) J28.39@4224.49,3379.95 ; v1@4220.03,3366.55 cw(c4225.06,3375.04) 4215.19,3375.04 ; J28.39@4246.61,3385.83 4248.52,3385.83 4248.52,3386.04 4247.68,3386.89 4242.86,3391.71 4231.86,3391.71 4215.19,3375.04 ; v3(5193.15,3914.41) U8.Y9@5212.83,3934.09 ; U8.Y9@5205.33,3934.09 cw(c5187.23,3934.09) 5200.03,3921.29 cw(c5212.83,3908.49) U8.Y9@5212.83,3926.59 ; U8.Y9@5205.49,3934.09 cw(c5187.77,3934.09) 5200.3,3921.56 cw(c5212.83,3909.03) U8.Y9@5212.83,3926.75 ; 5205.95,3927.21 cw(c5193.15,3940.02) 5193.15,3921.91 ccw(c5193.15,3940.02) 5205.95,3927.21 ; 5205.95,3927.21 ccw(c5218.76,3914.41) 5200.65,3914.41 cw(c5218.76,3914.41) 5205.95,3927.21
  MidLayer2 w4: v1(4215.19,3358.37) 4281.67,3358.37 4290,3366.71 4537.21,3366.71 4562.21,3391.71 4615.19,3391.71 4673.52,3450.04 4765.19,3450.04 4780.23,3435 4833.48,3435 4898.52,3500.04 ; v1@4219.08,3354.49 cw(c4228.47,3345.1) 4228.47,3358.37 cw(c4228.47,3371.65) v1@4219.08,3362.26 ; v1@4221.91,3351.66 cw(c4238.13,3335.44) 4238.13,3358.37 cw(c4238.13,3381.31) v1@4221.91,3365.09 ; 4844.24,3445.76 4898.52,3500.04 ; 5177.64,3876.97 5177.64,3890.9 ; 5181.76,3900.83 ccw(c5191.69,3890.9) 5177.64,3890.9 ; v3@5185.68,3913.76 cw(c5167.64,3912.18) 5181.51,3900.54 cw(c5195.38,3888.9) v3@5193.8,3906.94 ; 4898.52,3500.04 4898.52,3516.71 4904.19,3522.37 4940.19,3522.37 4948.52,3530.71 4948.52,3559.71 4963.86,3575.04 4976.52,3575.04 5051.52,3650.04 5170.64,3650.04 5177.64,3657.04 5177.64,3660 5177.64,3670 5177.64,3797.36 5177.64,3890.9
SPAREIO.4: J28.40 U8.Y10 | length 2998.9
  Top Layer w4: 4285.71,3366.71 cw(c4285.71,3350.59) J28.40@4297.11,3361.99 ; v1@4286.69,2933.37 ccw(c4263.76,2933.37) 4279.97,2949.59 ccw(c4296.19,2965.81) v1@4296.19,2942.87 ; 4288.45,3366.71 ccw(c4288.45,3378.96) J28.40@4297.11,3370.3 ; v1@4290.69,2933.37 ccw(c4277.41,2933.37) 4286.8,2942.76 ccw(c4296.19,2952.15) v1@4296.19,2938.87 ; v1(4296.19,2933.37) 4224.52,3005.04 4224.52,3341.71 4249.52,3366.71 4323.39,3366.71 4323.52,3366.71 4323.52,3366.14 J28.40@4323.39,3366.14 ; v3(5232.52,3914.41) U8.Y10@5252.2,3934.09 ; U8.Y10@5244.7,3934.09 cw(c5226.6,3934.09) 5239.4,3921.29 cw(c5252.2,3908.49) U8.Y10@5252.2,3926.59 ; U8.Y10@5244.86,3934.09 cw(c5227.14,3934.09) 5239.67,3921.56 cw(c5252.2,3909.03) U8.Y10@5252.2,3926.75 ; 5245.32,3927.21 cw(c5232.52,3940.02) 5232.52,3921.91 ccw(c5232.52,3940.02) 5245.32,3927.21 ; 5245.32,3927.21 ccw(c5258.13,3914.41) 5240.02,3914.41 cw(c5258.13,3914.41) 5245.32,3927.21
  MidLayer2 w4: v1(4296.19,2933.37) 4498.52,2933.37 4573.52,3008.37 4673.52,3008.37 4715.19,2966.71 4830.19,2966.71 5046.86,3183.37 5055.27,3183.37 5074.36,3202.46 5074.36,3224.02 5065,3233.37 5022.52,3233.37 4989.19,3266.71 4989.19,3340.04 5006.86,3357.71 5120.86,3357.71 5131.86,3368.71 5131.86,3470.04 5098.52,3503.37 5098.52,3557.35 5085.17,3570.71 5055,3570.71 5043.19,3558.9 5043.19,3542.04 5038.52,3537.37 5018.52,3537.37 5005.86,3550.04 5005.86,3581.71 5058.19,3634.04 5205.04,3634.04 5217.01,3646.01 5217.01,3660 5217.01,3670 5217.01,3797.36 5217.01,3890.9 ; v1@4300.08,2929.49 cw(c4309.47,2920.1) 4309.47,2933.37 cw(c4309.47,2946.65) v1@4300.08,2937.26 ; v1@4302.91,2926.66 cw(c4319.13,2910.44) 4319.13,2933.37 cw(c4319.13,2956.31) v1@4302.91,2940.09 ; 5217.01,3876.97 5217.01,3890.9 ; 5221.13,3900.83 ccw(c5231.06,3890.9) 5217.01,3890.9 ; v3@5225.05,3913.76 cw(c5207.01,3912.18) 5220.88,3900.54 cw(c5234.75,3888.9) v3@5233.17,3906.94
SPK.VOL: C105.2 U26.3 VR1.2 | length 7569
  Top Layer w4: U26.3@-389.13,5100 -184.81,5100 ; U26.3@-351.56,5095.89 cw(c-341.64,5085.97) -341.64,5100 cw(c-341.64,5114.03) U26.3@-351.56,5104.11 ; U26.3@-348.73,5093.06 cw(c-331.98,5076.31) -331.98,5100 cw(c-331.98,5123.69) U26.3@-348.73,5106.94 ; v1@-81.72,5438.28 cw(c-97.94,5422.06) -75,5422.06 cw(c-52.07,5422.06) v1@-68.28,5438.28 ; v1@-78.89,5441.11 cw(c-88.28,5431.72) -75,5431.72 cw(c-61.72,5431.72) v1@-71.11,5441.11 ; v1(-75,5445) -75,5400 -184.81,5290.19 -184.81,4929.81 -130,4875 -130,4820 -118.37,4808.37 290.19,4808.37 298.52,4800.04 298.52,4641.71 278.52,4621.71 278.52,4516.71 64.86,4303.04 64.86,4255.06 31.86,4222.06 31.86,3300.04 36.9,3295 135,3295 v4(175,3255) ; v4@65.19,2255 cw(c41.5,2255) 58.25,2238.25 cw(c75,2221.5) v4@75,2245.19 ; v4@69.19,2255 cw(c55.16,2255) 65.08,2245.08 cw(c75,2235.16) v4@75,2249.19 ; v4(75,2255) -40,2140 -40,1472.63 390.19,1042.44 390.19,604.81 ; v4@165.19,3255 ccw(c141.5,3255) 158.25,3271.75 ccw(c175,3288.5) v4@175,3264.81 ; v4@169.19,3255 ccw(c155.16,3255) 165.08,3264.92 ccw(c175,3274.84) v4@175,3260.81 ; VR1.2@403.3,562.06 ccw(c356.46,571.08) 390.19,604.81 ; VR1.2@407.23,561.31 ccw(c365.41,569.36) 395.52,599.48 ccw(c425.64,629.59) VR1.2@433.69,587.77 ; VR1.2@411.16,560.55 ccw(c374.35,567.64) 400.86,594.14 ccw(c427.36,620.65) VR1.2@434.45,583.84 ; VR1.2@415.09,559.8 ccw(c383.29,565.92) 406.19,588.81 ccw(c429.08,611.71) VR1.2@435.2,579.91 ; VR1.2@419.02,559.04 ccw(c392.23,564.19) 411.52,583.48 ccw(c430.81,602.77) VR1.2@435.96,575.98 ; VR1.2@432.94,591.7 cw(c423.92,638.54) 390.19,604.81 ; VR1.2@440,555 390.19,604.81
  MidLayer1 w4: v4@68.06,2261.94 ccw(c51.31,2278.69) 75,2278.69 ccw(c98.69,2278.69) v4@81.94,2261.94 ; v4@70.89,2259.11 ccw(c60.97,2269.03) 75,2269.03 ccw(c89.03,2269.03) v4@79.11,2259.11 ; v4(75,2255) 75,2625 -50,2750 -50,2905.94 -49.5,2906.44 -49.5,2907.12 -28.91,2927.71 17.29,2927.71 26.5,2918.5 26.5,2843.5 100,2770 205,2770 240,2805 240,2910 175,2975 v4(175,3255) ; v4@168.06,3248.06 cw(c151.31,3231.31) 175,3231.31 cw(c198.69,3231.31) v4@181.94,3248.06 ; v4@170.89,3250.89 cw(c160.97,3240.97) 175,3240.97 cw(c189.03,3240.97) v4@179.11,3250.89
  Bottom Layer w4: C105.2@-161.36,5444.25 -75.75,5444.25 v1(-75,5445) ; C105.2@-157.25,5440.14 cw(c-147.33,5430.22) -147.33,5444.25 cw(c-147.33,5458.28) C105.2@-157.25,5448.36 ; C105.2@-154.42,5437.31 cw(c-137.67,5420.56) -137.67,5444.25 cw(c-137.67,5467.93) C105.2@-154.42,5451.19 ; -99.75,5444.25 ccw(c-99.75,5469.75) v1@-81.72,5451.72 ; -96.12,5444.25 cw(c-96.12,5423.88) v1@-81.72,5438.28 ; -90.09,5444.25 ccw(c-90.09,5460.09) v1@-78.89,5448.89
SPK_L.SPK+: J34.1 U26.16 | length 1462.3
  Top Layer w12: J34.1@-171.19,6121.57 -171.03,6121.41 -30.16,6121.41 -18.75,6110 110,6110 140,6080 140,5855 60,5775 60,5260 27.02,5227.02 27.02,5207.02 ; J34.1@-154.55,6104.93 cw(c-114.77,6065.15) -114.77,6121.41 ; J34.1@-154.55,6138.2 ccw(c-114.01,6178.75) -114.01,6121.41 ; U26.16@-30.87,5200 20,5200 27.02,5207.02 ; U26.16@-0.8,5194.83 ccw(c6.81,5206.4) 16.61,5196.61 ; U26.16@5.79,5204.85 ccw(c15.08,5218.97) 27.02,5207.02 ; U26.16@6.71,5195.89 cw(c16.63,5185.97) 16.63,5200 cw(c16.63,5214.03) U26.16@6.71,5204.11
SPK_L.SPK-: C106.1 J34.2 U26.14 | length 2236.5
  Top Layer w12: U26.14@-30.87,5100 50,5100 130.87,5019.13 130.87,4980.87 85,4935 v1(85,4905) v1@85,4900 ; U26.14@6.71,5095.89 cw(c16.63,5085.97) 16.63,5100 cw(c16.63,5114.03) U26.14@6.71,5104.11 ; v1@81.11,4908.89 ccw(c71.72,4918.28) 85,4918.28 ccw(c98.28,4918.28) v1@88.89,4908.89
  MidLayer1 w12: J34.2@-103,6160.94 -5.94,6160.94 65,6090 65,5965 53.19,5953.19 53.19,5302.03 -13.48,5235.36 -13.48,5028.48 67.28,4947.72 67.28,4922.72 v1(85,4905) ; J34.2@-86.36,6144.3 cw(c-46.2,6104.14) -46.2,6160.94 cw(c-46.2,6217.74) J34.2@-86.36,6177.57 ; v1@79.5,4905 ccw(c66.22,4905) 75.61,4914.39 ccw(c85,4923.78) v1@85,4910.5
  Bottom Layer w12: C106.1@6.06,4845.28 50.28,4845.28 85,4880 v1(85,4905) ; C106.1@20.83,4858.7 ccw(c42.13,4885.1) 66.11,4861.11 ; C106.1@28.36,4868.04 ccw(c50.56,4895.56) 75.56,4870.56 ; C106.1@35.89,4877.38 ccw(c58.99,4906.01) 85,4880 ; v1@81.11,4901.11 cw(c71.72,4891.72) 85,4891.72 cw(c98.28,4891.72) v1@88.89,4901.11
SPK_R.SPK+: J35.1 U26.9 | length 9285
  Top Layer w12: U26.9@-68.44,4854.11 ccw(c-77.67,4863.34) v1@-64.62,4863.34 ; v1@-64.62,4864.72 ccw(c-49.61,4864.72) U26.9@-60.22,4854.11
  Top Layer w23: v1(-64.62,4868.69) -64.62,4850.38 U26.9@-64.24,4850
  MidLayer2 w12: v1(-64.62,4868.69) 8.69,4868.69 69.97,4929.97 96.62,4929.97 223.89,5057.24 ; v1@-60.73,4864.8 cw(c-51.34,4855.41) -51.34,4868.69 cw(c-51.34,4881.97) v1@-60.73,4872.58 ; 223.89,5057.29 250,5083.41 250,5182.63 236,5196.63 236,5563.37 284.63,5612 1465.63,5612 1606.93,5753.3 1840.93,5753.3 1897.63,5810 2693,5810 2735,5852 2821,5852 2861,5812 4473,5812 4507.5,5777.5 4795.53,5777.5 4806.49,5766.54 5231.63,5766.54 5274.09,5809 5821.22,5809 6090,6077.78 6090,6232.63 6198.37,6341 6328,6341 6374.99,6387.99 6705.03,6387.99 6761.85,6444.81 6970.32,6444.81 6972.94,6442.19 7137.81,6442.19 7179.52,6400.48 7271.5,6308.5 7725.87,6308.5 7784.36,6250.01 J35.1@7784.36,6160.94 ; J35.1@7767.73,6177.57 ccw(c7727.56,6217.74) 7784.36,6217.74 ccw(c7841.16,6217.74) J35.1@7801,6177.57
SPK_R.SPK-: C107.1 J35.2 U26.11 | length 10485.4
  Top Layer w12: U26.11@-30.87,4950 50,4950 60,4940 60,4895 75,4880 ; U26.11@6.71,4945.89 cw(c16.63,4935.97) 16.63,4950 cw(c16.63,4964.03) U26.11@6.71,4954.11 ; v1@108.54,4895.78 cw(c75,4923.53) 75,4880 ; v1(112.78,4892.28) 100.5,4880 ; v1@117.79,4888.14 cw(c100.5,4902.44) 100.5,4880 ; 75,4880 100.5,4880
  MidLayer2 w12: v1@107.28,4892.28 cw(c94,4892.28) 103.39,4882.89 cw(c112.78,4873.5) v1@112.78,4886.78 ; v1@108.89,4896.17 ccw(c99.5,4905.56) 112.78,4905.56 ccw(c126.06,4905.56) v1@116.67,4896.17 ; v1@414.5,4930 ccw(c401.22,4930) 410.61,4939.39 ccw(c420,4948.78) v1@420,4935.5 ; v1(420,4930) 369.88,4980.12 169.4,4980.12 112.78,4923.5 v1(112.78,4892.28) 67.69,4847.19 -77.19,4847.19 -90,4860 -90,4880 -79.81,4890.19 7.56,4890.19 63.34,4945.97 89.94,4945.97 234,5090.03 234,5176 220,5190 220,5570 278,5628 1459,5628 1600.3,5769.3 1834.3,5769.3 1891,5826 2673.37,5826 2686.37,5826 2728.37,5868 2827.63,5868 2867.13,5828.5 4479.13,5828.5 4514.13,5793.5 4802.16,5793.5 4813.12,5782.54 5225,5782.54 5267.46,5825 5814.59,5825 6074,6084.41 6074,6239.25 6191.75,6357 6320.01,6357 6367,6403.99 ; 6366.34,6403.99 6367,6403.99 ; J35.2@7835.92,6138.2 ccw(c7795.75,6178.37) 7852.55,6178.37 ccw(c7909.36,6178.37) J35.2@7869.19,6138.2 ; J35.2@7852.55,6121.57 7852.55,6204.45 7732,6325 7277.63,6325 7144.44,6458.19 6979.57,6458.19 6976.95,6460.81 6755.22,6460.81 6698.4,6403.99 6367,6403.99
  Bottom Layer w4: v1(420,4930) v1@422.37,4930
  Bottom Layer w12: v1@420,4924.5 cw(c420,4911.22) 429.39,4920.61 cw(c438.78,4930) v1@425.5,4930 ; v1(420,4930) 446.06,4903.94 ; C107.1@432.11,4884.09 ccw(c424.97,4903.93) 446.06,4903.93 ; C107.1@446.06,4845.28 446.06,4903.94 ; C107.1@460.02,4884.09 cw(c467.16,4903.93) 446.06,4903.93
SW#.D0: J28.1 R102.2 SW1.2 U8.K1 | length 8616.6
  Top Layer w4: v1@4173.36,4440.71 ccw(c4150.42,4440.71) 4166.64,4456.93 ccw(c4182.86,4473.14) v1@4182.86,4450.21 ; v1@4177.36,4440.71 ccw(c4164.08,4440.71) 4173.47,4450.1 ccw(c4182.86,4459.49) v1@4182.86,4446.21 ; 4215.19,4141.52 ccw(c4232.15,4141.52) J28.1@4220.16,4129.53 ; 4215.19,4151.17 ccw(c4241.8,4151.17) J28.1@4222.98,4132.35 ; 4215.19,4160.83 ccw(c4251.46,4160.83) J28.1@4225.81,4135.18 ; 4215.19,4170.49 ccw(c4261.12,4170.49) J28.1@4228.64,4138.01 ; J28.1@4219.18,4131.34 ccw(c4215.19,4129.44) 4215.19,4133.86 ; J28.1@4219.18,4136.38 cw(c4215.19,4138.28) 4215.19,4133.86 ; J28.1@4246.61,4133.86 4215.19,4133.86 ; v1@4293.28,1571.72 ccw(c4277.06,1587.93) 4300,1587.93 ccw(c4322.93,1587.93) v1@4306.72,1571.72 ; v1@4296.11,1568.89 ccw(c4286.72,1578.28) 4300,1578.28 ccw(c4313.28,1578.28) v1@4303.89,1568.89 ; v1(4300,1565) 4300,1595 4312,1607 4312,1902.65 4321.46,1912.1 4321.46,1933.23 4290.52,1964.16 4290.52,2304.48 4256.86,2338.14 4256.86,2481.67 3848.52,2890 3848.52,3288.67 3597.19,3540 3597.19,3789.77 3832.19,4024.77 3832.19,4050 3931.86,4149.67 3931.86,4316.71 3925.82,4322.75 3925.82,4869 3981.86,4925.04 4148.52,4925.04 4165.19,4908.37 4165.19,4835 4150,4819.81 4150,4473.56 v1(4182.86,4440.71) 4198.52,4425.04 4198.52,4383.37 4156.86,4341.71 4156.86,4283.37 4215.19,4225.04 4215.19,4133.86 ; v1@4344.68,4416.55 ccw(c4339.66,4425.04) 4349.52,4425.04 ; v1(4349.52,4408.37) 4349.52,4425.04 ; v1@4354.36,4416.55 cw(c4359.39,4425.04) 4349.52,4425.04 ; U8.K1@4892.57,4322.49 ccw(c4879.77,4309.69) 4879.77,4327.8 ccw(c4879.77,4345.9) U8.K1@4892.57,4333.1 ; U8.K1@4897.87,4327.8 4870,4327.8 4860,4327.8 4841,4327.8 4812.2,4327.8 4754.96,4385.04 4572,4385.04 4545,4358.04 4512.54,4358.04 4428.88,4441.71 4366.19,4441.71 4349.52,4425.04 ; R102.2@5302.92,957.23 ccw(c5287.01,941.32) 5287.01,963.82 ccw(c5287.01,986.32) R102.2@5302.92,970.41 ; R102.2@5303.41,957.23 cw(c5287.5,941.32) 5310,941.32 cw(c5332.5,941.32) R102.2@5316.59,957.23 ; R102.2@5305.75,960.06 ccw(c5296.67,950.98) 5296.67,963.82 ccw(c5296.67,976.66) R102.2@5305.75,967.58 ; R102.2@5306.24,960.06 cw(c5297.16,950.98) 5310,950.98 cw(c5322.84,950.98) R102.2@5313.76,960.06 ; SW1.2@5307.02,911.31 ccw(c5299.84,918.49) SW1.2@5310,918.49 ; 5310,921.96 ccw(c5341.83,921.96) SW1.2@5321.83,897.2 ; 5310,930.33 ccw(c5348.58,930.33) SW1.2@5324.35,900.31 ; 5310,938.7 ccw(c5355.34,938.7) SW1.2@5326.86,903.42 ; 5310,947.07 ccw(c5362.1,947.07) SW1.2@5329.37,906.54 ; R102.2@5310,955.44 ccw(c5368.86,955.44) SW1.2@5331.88,909.65 ; SW1.2@5327.52,896.81 5310,914.33 R102.2@5310,963.82 ; SW1.2@5334.4,912.76 cw(c5375.62,963.81) R102.2@5310,963.82 ; v1@5364.02,1010.04 ccw(c5341.09,1010.04) 5357.31,1026.26 ccw(c5373.52,1042.48) v1@5373.52,1019.54 ; v1@5368.02,1010.04 ccw(c5354.75,1010.04) 5364.14,1019.43 ccw(c5373.52,1028.82) v1@5373.52,1015.54 ; v1(5373.52,1010.04) 5348.56,1035 5290,1035 5270,1015 5270,975 5281.18,963.82 R102.2@5310,963.82 ; 4880.15,4327.8 cw(c4880.15,4310.07) 4892.68,4322.6 ccw(c4880.15,4310.07) 4880.15,4327.8 ; 4880.15,4327.8 ccw(c4880.15,4345.52) 4892.68,4332.99 cw(c4880.15,4345.52) 4880.15,4327.8
  MidLayer1 w4: v4@4283.06,1281.94 ccw(c4266.31,1298.69) 4290,1298.69 ccw(c4313.69,1298.69) v4@4296.94,1281.94 ; 4283.6,1548.35 ccw(c4266.95,1565) v1@4290.5,1565 ; 4284.22,1548.96 cw(c4300,1533.18) v1@4300,1555.5 ; v4@4285.89,1279.11 ccw(c4275.97,1289.03) 4290,1289.03 ccw(c4304.03,1289.03) v4@4294.11,1279.11 ; v4(4290,1275) 4290,1320 4281.86,1328.14 4281.86,1546.6 4300,1564.75 v1(4300,1565) ; 4290.43,1555.18 ccw(c4280.61,1565) v1@4294.5,1565 ; 4291.05,1555.79 cw(c4300,1546.84) v1@4300,1559.5
  MidLayer2 w4: v1(4182.86,4440.71) 4266.19,4440.71 4298.52,4408.37 v1(4349.52,4408.37) ; v1@4186.75,4436.82 cw(c4196.14,4427.43) 4196.14,4440.71 cw(c4196.14,4453.99) v1@4186.75,4444.6 ; v1@4189.57,4433.99 cw(c4205.79,4417.77) 4205.79,4440.71 cw(c4205.79,4463.64) v1@4189.57,4447.43 ; v4@4290.03,1269.19 cw(c4290.1,1255.41) 4299.85,1265.15 cw(c4309.59,1274.9) v4@4295.81,1274.97 ; v4(4290,1275) 4306.63,1258.37 ; v4@4290.05,1265.19 cw(c4290.17,1241.93) 4306.62,1258.38 ; v4@4299.81,1274.95 ccw(c4323.07,1274.83) 4306.62,1258.38 ; v1@4342.81,4401.66 ccw(c4326.59,4385.44) 4326.59,4408.37 ccw(c4326.59,4431.31) v1@4342.81,4415.09 ; v1@4345.64,4404.49 ccw(c4336.25,4395.1) 4336.25,4408.37 ccw(c4336.25,4421.65) v1@4345.64,4412.26 ; v1@5366.81,1016.76 ccw(c5350.59,1032.98) 5373.52,1032.98 ccw(c5396.46,1032.98) v1@5380.24,1016.76 ; v1@5369.64,1013.93 ccw(c5360.25,1023.32) 5373.52,1023.32 ccw(c5386.8,1023.32) v1@5377.41,1013.93 ; v1(5373.52,1010.04) 5373.52,1033.37 5290.19,1116.71 5023.52,1116.71 4881.86,1258.37 4306.63,1258.37
SW#.D1: J28.2 R103.2 SW2.2 U8.U3 | length 7945.9
  Top Layer w4: v1@3630.69,3991.71 cw(c3607.76,3991.71) 3623.97,3975.49 cw(c3640.19,3959.27) v1@3640.19,3982.21 ; v1@3634.69,3991.71 cw(c3621.41,3991.71) 3630.8,3982.32 cw(c3640.19,3972.93) v1@3640.19,3986.21 ; v1(3640.19,3991.71) 3606.86,3958.37 3540.19,3958.37 3523.52,3941.71 3523.52,2347.02 3503,2326.5 3503,1848 3480,1825 3421.31,1825 3408,1811.69 3408,1373.31 3423.27,1358.04 3658.04,1358.04 3670,1370 3696.86,1370 3706.86,1360 v1(3706.86,1308.37) ; v1@3700.14,1315.09 ccw(c3683.92,1331.31) 3706.86,1331.31 ccw(c3729.79,1331.31) v1@3713.57,1315.09 ; v1@3702.97,1312.26 ccw(c3693.58,1321.65) 3706.86,1321.65 ccw(c3720.14,1321.65) v1@3710.75,1312.26 ; v1(4115.19,4091.71) 4140.19,4116.71 J28.2@4316.86,4116.71 ; v1@4115.19,4097.21 ccw(c4115.19,4110.49) 4124.58,4101.1 ccw(c4133.97,4091.71) v1@4120.69,4091.71 ; v1@4115.19,4101.21 ccw(c4115.19,4124.14) 4131.41,4107.93 ccw(c4147.63,4091.71) v1@4124.69,4091.71 ; 4280.96,4116.71 cw(c4280.96,4093.87) J28.2@4297.11,4110.02 ; 4290.62,4116.71 cw(c4290.62,4103.53) J28.2@4299.93,4112.85 ; 4293.2,4116.71 ccw(c4293.2,4122.24) J28.2@4297.11,4118.33 ; J28.2@4323.52,4114.17 J28.2@4323.39,4114.17 4459.39,4114.17 4481.86,4091.71 4481.86,4026.04 4491.19,4016.71 4506.86,4016.71 4537.39,4047.24 4556.69,4066.54 ; J28.2@4349.67,4110.02 cw(c4359.69,4099.99) 4359.69,4114.17 cw(c4359.69,4128.35) J28.2@4349.67,4118.33 ; 4556.86,4066.71 4556.69,4066.54 ; 4855.26,4028.34 4860,4028.34 4870,4028.34 4936.73,4028.34 ; 4856.86,4028.34 4776.37,4028.34 4773.24,4025.21 4724.79,4025.21 4683.46,4066.54 4674.63,4075.37 4565.52,4075.37 4556.69,4066.54 ; v1@5728.28,1063.82 cw(c5712.06,1047.61) 5735,1047.61 cw(c5757.93,1047.61) v1@5741.72,1063.82 ; v1@5731.11,1066.65 cw(c5721.72,1057.26) 5735,1057.26 cw(c5748.28,1057.26) v1@5738.89,1066.65 ; v1(5735,1070.54) 5735,1013.82 R103.2@5785,963.82 5785,936.73 5805.02,916.71 SW2.2@5805.02,896.81 ; 5768.25,980.57 cw(c5751.5,963.82) R103.2@5775.19,963.82 ; 5769.44,979.38 ccw(c5784.51,994.45) R103.2@5784.51,973.14 ; R103.2@5775.08,973.74 cw(c5765.16,963.82) R103.2@5779.19,963.82 ; R103.2@5776.27,972.55 ccw(c5784.51,980.79) R103.2@5784.51,969.14 ; R103.2@5778.41,957.23 cw(c5762.5,941.32) 5785,941.32 cw(c5807.5,941.32) R103.2@5791.59,957.23 ; R103.2@5781.24,960.06 cw(c5772.16,950.98) 5785,950.98 cw(c5797.84,950.98) R103.2@5788.76,960.06 ; 5784.39,937.33 cw(c5760.87,913.81) SW2.2@5791.26,900.27 ; 5788.51,933.22 cw(c5766.56,911.28) SW2.2@5794.91,898.64 ; 5792.62,929.11 cw(c5772.25,908.74) SW2.2@5798.56,897.01 ; 5796.74,924.99 cw(c5777.95,906.2) SW2.2@5802.22,895.39 ; 5800.85,920.88 cw(c5783.64,903.67) SW2.2@5805.87,893.76 ; 4936.73,4028.34 ccw(c4936.73,4067.02) 4964.08,4039.67 ; 4936.73,4028.34 ccw(c4936.73,4067.02) 4964.08,4039.67 ; 4964.08,4039.67 cw(c4976.61,4027.14) 4976.61,4044.86 ccw(c4976.61,4027.14) 4964.08,4039.67 ; 4964.08,4039.67 ccw(c4951.55,4052.2) 4969.27,4052.2 cw(c4951.55,4052.2) 4964.08,4039.67
  Bottom Layer w4: v1(3640.19,3991.71) 3748.52,4100.04 4080,4100.04 4088.33,4091.71 v1(4115.19,4091.71) ; v1@3640.19,3997.21 ccw(c3640.19,4010.49) 3649.58,4001.1 ccw(c3658.97,3991.71) v1@3645.69,3991.71 ; v1@3640.19,4001.21 ccw(c3640.19,4024.14) 3656.41,4007.93 ccw(c3672.63,3991.71) v1@3649.69,3991.71 ; v1(3706.86,1308.37) 3757.52,1359.04 4758.56,1359.04 4853.6,1264 5006.63,1264 5018,1275.37 5075.63,1275.37 5125,1226 5169.71,1226 5179,1216.71 5206.65,1216.71 5249.31,1259.37 5465.95,1259.37 5640.33,1085 5716.31,1085 5728,1073.31 5728,1071.28 5735,1064.28 v1(5735,1070.54) ; v1@3706.86,1313.87 ccw(c3706.86,1327.15) 3716.25,1317.76 ccw(c3725.64,1308.37) v1@3712.36,1308.37 ; v1@3706.86,1317.87 ccw(c3706.86,1340.81) 3723.07,1324.59 ccw(c3739.29,1308.37) v1@3716.36,1308.37 ; v1@4108.47,4084.99 ccw(c4092.26,4068.77) 4092.26,4091.71 ccw(c4092.26,4114.64) v1@4108.47,4098.43 ; v1@4111.3,4087.82 ccw(c4101.91,4078.43) 4101.91,4091.71 ccw(c4101.91,4104.99) v1@4111.3,4095.6 ; 5718.43,1082.89 ccw(c5727.96,1092.42) v1@5732.09,1079.58 ; 5721.77,1079.54 cw(c5712.77,1070.54) v1@5725.5,1070.54 ; 5723.06,1078.25 ccw(c5730.22,1085.41) v1@5733.32,1075.78